# EAGLE board BikeAlarmSystem (EAGLE 8.5.2)
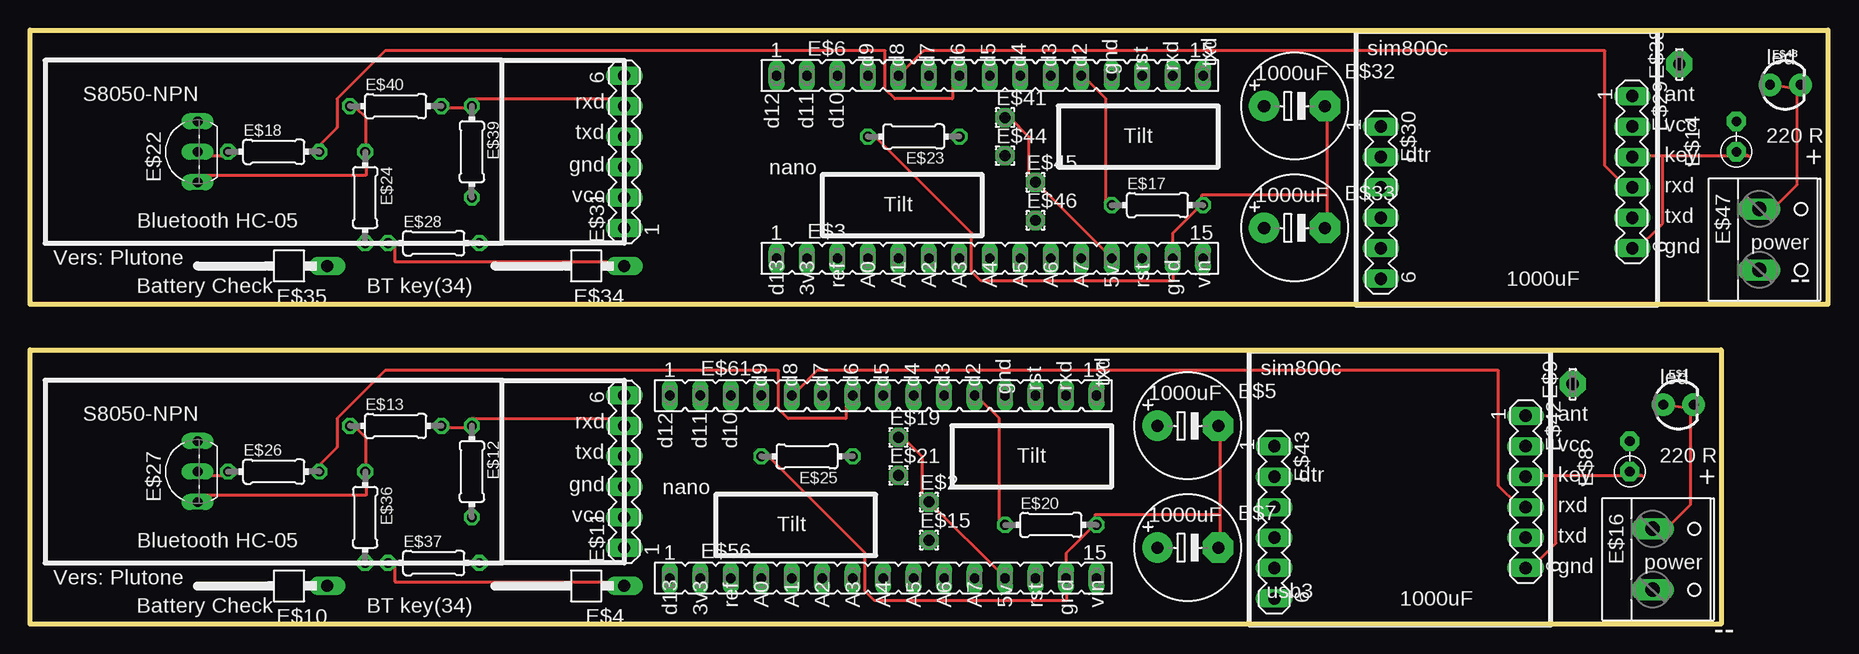
[diagram p0: board, top side]
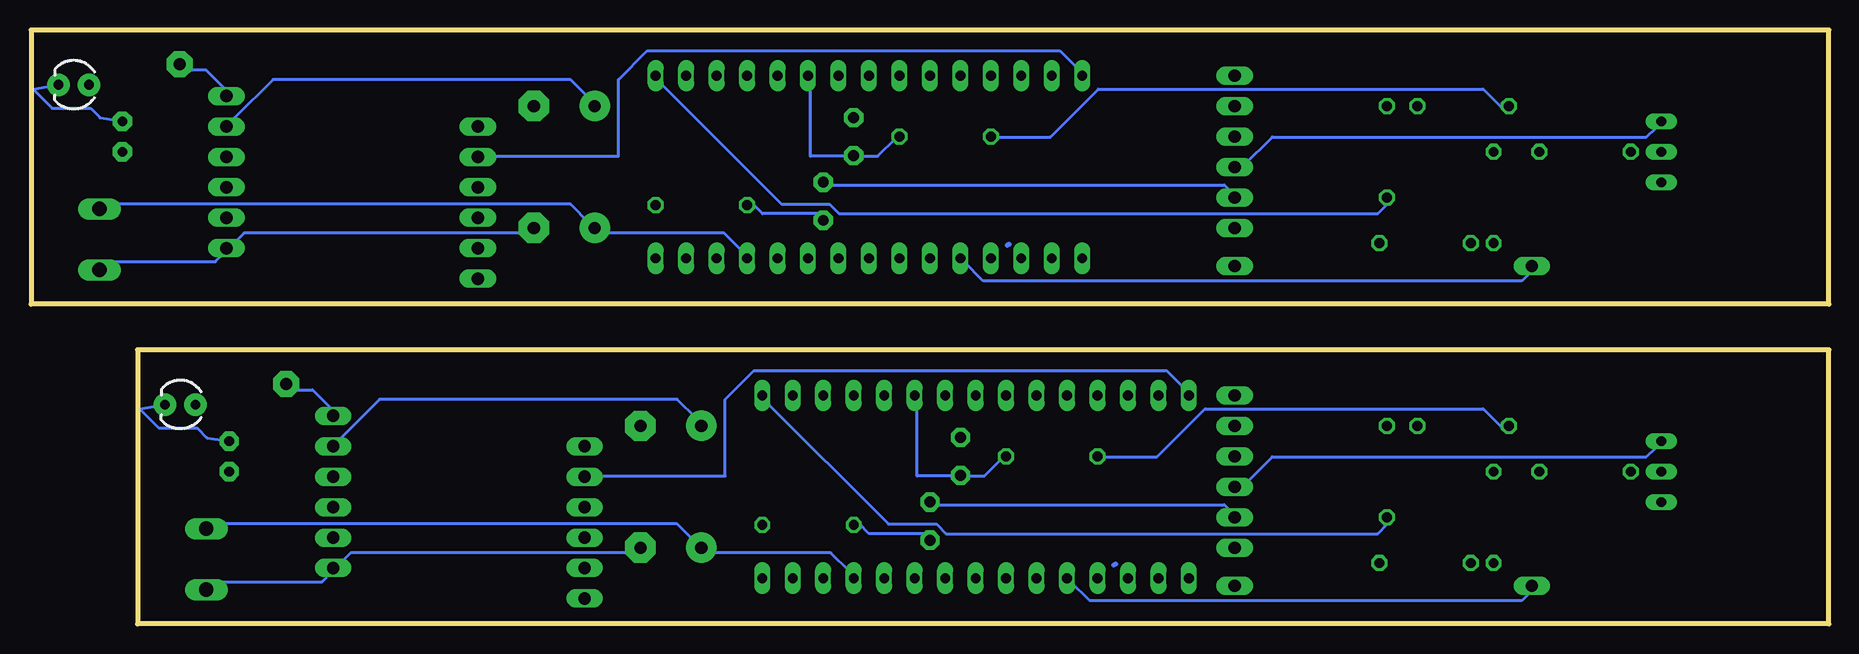
[diagram p1: board, bottom side, seen from below]

Size 149.86 x 49.53 mm. Coordinates in mm from the lower left corner, seen from the top.
Outline: 0,0 0,22.86 140.97,22.86 140.97,0 0,0
Outline: 0,26.67 0,49.53 149.86,49.53 149.86,26.67 0,26.67
Copper layers (1*16): Top 0.035mm / dielectric 1.5mm / Bottom 0.035mm
Design rules "default": minimum track width 10mil, minimum drill 24mil, track to track 8mil, track to pad 8mil, pad to pad 8mil, via to via 8mil, smd to smd 8mil, copper to edge 40mil, drill to drill 8mil, minimum pad ring 10mil, minimum via ring 8mil, stop-mask expansion 4mil, vias tented up to drill 0mil, thermal gap 10mil

## Footprints (pad centres in the part's own frame; a part is rotated, then mirrored left to right if it is on the bottom)
LED_3MM = drill 0.813 pad 1.88: A -1.27,0; K 1.27,0
1,6/0,9 = drill 0.914 pad 1.6 octagon: 1 0,0
FE15 = drill 0.813 long: 1 -17.78,0; 2 -15.24,0; 3 -12.7,0; 4 -10.16,0; 5 -7.62,0; 6 -5.08,0; 7 -2.54,0; 8 0,0; 9 2.54,0; 10 5.08,0; 11 7.62,0; 12 10.16,0; 13 12.7,0; 14 15.24,0; 15 17.78,0
1X01/90 = drill 1.016 long: 1 -1.27,-3.81
E5-8,5 = drill 1.016 pad 2.54: + -2.54,0 | drill 1.016 pad 2.54 octagon: - 2.54,0
RS-2,5 = drill 0.813 pad 1.6 octagon: 1 -1.27,0; 2 1.27,0
LSP10 = drill 1.016 pad 2.159 octagon: MP 0,0
MA06-1 = drill 1.016 long: 1 -6.35,0; 2 -3.81,0; 3 -1.27,0; 4 1.27,0; 5 3.81,0; 6 6.35,0
0204/7 = drill 0.813 octagon: 1 -3.81,0; 2 3.81,0
W237-132 = drill 1.194 long: 1 -2.54,-0.635; 2 2.54,-0.635
TO92- = drill 0.813 long: 1 2.54,0; 2 0,0; 3 -2.54,0

## Placement (x,y rotation side)
E$1  [LED_3MM]  137.41,18.29 0 top
E$2  [1,6/0,9]  74.93,10.16 0 top
E$3  [FE15]  80.01,30.48 0 top
E$4  [1X01/90]  45.72,4.45 90 top
E$5  [E5-8,5]  96.52,16.51 0 top
E$6  [FE15]  80.01,45.72 0 top
E$7  [E5-8,5]  96.52,6.35 0 top
E$8  [RS-2,5]  133.35,13.97 90 top
E$9  [LSP10]  128.59,20 90 top
E$10  [1X01/90]  20.95,4.45 90 top
E$11  [MA06-1]  49.53,12.7 90 top
E$12  10k  [0204/7]  36.83,12.7 270 top
E$13  22k  [0204/7]  30.48,16.51 0 top
E$14  [RS-2,5]  142.24,40.64 90 top
E$15  [1,6/0,9]  74.93,6.99 0 top
E$16  [W237-132]  135.89,5.4 270 top
E$17  10k  [0204/7]  93.98,34.92 0 top
E$18  2.2k  [0204/7]  20.32,39.37 0 top
E$19  [1,6/0,9]  72.39,15.56 0 top
E$20  10k  [0204/7]  85.09,8.26 0 top
E$21  [1,6/0,9]  72.39,12.38 0 top
E$22  [TO92-]  13.97,39.37 90 top
E$23  10k  [0204/7]  73.66,40.64 180 top
E$24  22k  [0204/7]  27.94,35.56 270 top
E$25  10k  [0204/7]  64.77,13.97 180 top
E$26  2.2k  [0204/7]  20.32,12.7 0 top
E$27  [TO92-]  13.97,12.7 90 top
E$28  10k  [0204/7]  33.66,31.75 0 top
E$29  [MA06-1]  133.56,37.68 270 top
E$30  [MA06-1]  112.61,35.14 270 top
E$31  [MA06-1]  49.53,39.37 90 top
E$32  [E5-8,5]  105.41,43.18 0 top
E$33  [E5-8,5]  105.41,33.02 0 top
E$34  [1X01/90]  45.72,31.11 90 top
E$35  [1X01/90]  20.95,31.11 90 top
E$36  22k  [0204/7]  27.94,8.89 270 top
E$37  10k  [0204/7]  33.66,5.08 0 top
E$38  [LSP10]  137.48,46.67 90 top
E$39  10k  [0204/7]  36.83,39.37 270 top
E$40  22k  [0204/7]  30.48,43.18 0 top
E$41  [1,6/0,9]  81.28,42.23 0 top
E$42  [MA06-1]  124.67,11.01 270 top
E$43  [MA06-1]  103.72,8.47 270 top
E$44  [1,6/0,9]  81.28,39.05 0 top
E$45  [1,6/0,9]  83.82,36.83 0 top
E$46  [1,6/0,9]  83.82,33.65 0 top
E$47  [W237-132]  144.78,32.07 270 top
E$48  [LED_3MM]  146.3,44.96 0 top
E$56  [FE15]  71.12,3.81 0 top
E$61  [FE15]  71.12,19.05 0 top

## Library data of the parts
E$1 E$48 = SparkFun-LED
E$2 E$15 E$19 E$21 E$41 E$44-E$46 = wirepad
E$3 E$6 E$56 E$61 = con-lsta
E$4 E$10 E$34 E$35 = pinhead
E$5 E$7 E$32 E$33 = ref-packages-longpad
E$8 E$14 = discrete
E$9 E$38 = solpad
E$11 E$29-E$31 E$42 E$43 = con-lstb
E$12 E$13 E$17 E$18 E$20 E$23-E$26 E$28 E$36 E$37 E$39 E$40 = eagle-ltspice
E$16 E$47 = con-wago-508
E$22 E$27 = transistor-fet

## Nets
S$2: E$11.3 E$27.1
S$3: E$61.14
S$4: E$14.2 E$48.K
S$5: E$61.3
S$7: E$1.K E$8.2
S$8: E$6.11 E$17.1 E$46.1
S$9: E$9.MP E$42.1
S$10: E$26.1 E$27.2
S$11: E$12.2 E$61.15
S$12: E$61.6
S$13: E$42.4 E$61.5
S$14: E$5.+ E$42.2
S$15: E$43.2 E$61.1
S$16: E$61.2
S$17: E$61.8
S$18: E$61.9
S$19: E$61.12
S$20: E$26.2 E$61.7
S$21: E$61.13
S$22: E$56.1
S$23: E$56.2
S$24: E$56.3
S$25: E$56.4
S$26: E$1.A E$2.1 E$7.+ E$11.2 E$16.1 E$19.1 E$56.12
S$27: E$10.1 E$56.5
S$28: E$56.6
S$29: E$56.7
S$30: E$56.8
S$31: E$4.1 E$36.2 E$37.1
S$32: E$56.9
S$33: E$56.10
S$34: E$11.5 E$12.1 E$13.2
S$35: E$15.1 E$20.1 E$61.11
S$36: E$56.11
S$37: E$56.13
S$38: E$56.15
S$39: E$21.1 E$25.1 E$61.10
S$40: E$18.1 E$22.2
S$42: E$5.- E$7.- E$8.1 E$13.1 E$16.2 E$20.2 E$25.2 E$27.3 E$36.1 E$42.3 E$42.6 E$56.14
S$43: E$6.7 E$18.2
S$44: E$24.2 E$28.1 E$34.1
S$45: E$11.4
S$46: E$6.15 E$39.2
S$47: E$31.4
S$48: E$37.2
S$49: E$6.14
S$50: E$42.5
S$51: E$29.5
S$52: E$6.6
S$53: E$6.5 E$29.4
S$54: E$28.2
S$55: E$6.3
S$56: E$6.1 E$30.2
S$57: E$6.2
S$58: E$6.8
S$59: E$6.9
S$60: E$6.12
S$61: E$6.13
S$62: E$3.1
S$63: E$3.2
S$64: E$3.3
S$65: E$3.4
S$66: E$3.5 E$35.1
S$67: E$3.6
S$68: E$3.7
S$69: E$3.8
S$70: E$3.9
S$71: E$3.10
S$72: E$3.11
S$73: E$3.13
S$74: E$3.15
S$75: E$3.14 E$14.1 E$17.2 E$22.3 E$23.2 E$24.1 E$29.3 E$29.6 E$32.- E$33.- E$40.1 E$47.2
S$77: E$29.2 E$32.+
S$78: E$29.1 E$38.MP
S$79: E$31.5 E$39.1 E$40.2
S$80: E$3.12 E$31.2 E$33.+ E$41.1 E$45.1 E$47.1 E$48.A
S$81: E$6.10 E$23.1 E$44.1
S$82: E$22.1 E$31.3

## Tracks (layer width: path | path; a pad name or v marks a point on that pad's centre or on a via)
S$2
  Bottom 0.254: E$27.1 14.4,14.73 15.2,13.93 46.4,13.93 48.8,11.53 E$11.3
S$4
  Bottom 0.254: E$14.2 144.09,42.2 144.89,43 148.09,43 149.69,44.6 E$48.K
S$7
  Bottom 0.254: E$8.2 135.2,15.53 136,16.33 139.2,16.33 140.8,17.93 E$1.K
S$8
  Top 0.254: E$6.11 88.09,45.4 89.69,43.8 89.69,35 E$17.1
  Bottom 0.254: E$17.1 89.69,35 88.89,34.2 84.09,34.2 E$46.1
S$9
  Bottom 0.254: E$42.1 124.8,17.93 126.4,19.53 128,19.53 E$9.MP
S$10
  Top 0.254: E$27.2 14.4,12.33 16,12.33 E$26.1
S$11
  Bottom 0.254: E$12.2 36.8,8.33 37.6,7.53 73.6,7.53 74.4,8.33 78.4,8.33 88.8,18.73 E$61.15
S$13
  Top 0.254: E$61.5 64,19.53 65.6,21.13 122.4,21.13 122.4,11.53 124,9.93 E$42.4
S$14
  Bottom 0.254: E$42.2 124,15.53 120.8,18.73 96,18.73 94.4,17.13 E$5.+
S$15
  Bottom 0.254: E$61.1 53.6,19.53 55.2,21.13 89.6,21.13 92,18.73 92,12.33 103.2,12.33 E$43.2
S$20
  Top 0.254: E$26.2 24,13.13 25.6,14.73 25.6,17.13 29.6,21.13 62.4,21.13 62.4,17.93 63.2,17.13 68,17.13 68,18.73 E$61.7
S$26
  Top 0.254: E$16.1 136.8,8.33 138.4,9.93 138.4,17.93 E$1.A | E$56.12 80.8,4.33 75.2,9.93 E$2.1 74.4,10.73 74.4,13.93 72.8,15.53 E$19.1
  Bottom 0.254: E$11.2 49.6,9.13 50.4,9.93 74.4,9.93 E$2.1 | E$56.12 81.6,4.33 83.2,5.93 93.6,5.93 E$7.+ 94.4,6.73 96,8.33 136,8.33 E$16.1
S$27
  Bottom 0.254: E$56.5 63.2,3.53 61.6,1.93 25.6,1.93 24.8,2.73 E$10.1
S$31
  Top 0.254: E$36.2 28,5.13 29.6,5.13 E$37.1 30.4,5.13 30.4,3.53 48.8,3.53 E$4.1
S$34
  Top 0.254: E$13.2 34.4,16.33 36.8,16.33 E$12.1 36.8,17.13 48.8,17.13 E$11.5
S$35
  Top 0.254: E$61.11 79.2,18.73 80.8,17.13 80.8,8.33 E$20.1
  Bottom 0.254: E$20.1 80.8,8.33 80,7.53 75.2,7.53 E$15.1
S$39
  Bottom 0.254: E$25.1 68.8,13.93 70.4,12.33 72,12.33 E$21.1 72.8,12.33 76,12.33 76,18.73 E$61.10
S$40
  Top 0.254: E$22.2 14.4,39 16,39 E$18.1
S$41
  Bottom 0.406: 59.44,4.99 59.6,4.91
S$42
  Top 0.254: 127.2,12.33 134.4,12.33 E$8.1 | 127.2,12.33 124.8,12.33 E$42.3 | 127.2,12.33 127.2,6.73 124.8,4.33 E$42.6 | E$27.3 14.4,10.73 28,10.73 28,12.33 E$36.1 28,13.13 28,15.53 27.2,16.33 E$13.1 | 99.2,9.13 99.2,16.33 E$5.- | 99.2,9.13 99.2,6.73 E$7.- | E$25.2 61.6,13.93 69.6,5.93 69.6,2.73 70.4,1.93 86.4,1.93 86.4,3.53 E$56.14 86.4,4.33 86.4,5.93 88.8,8.33 | 99.2,9.13 88.8,9.13 88.8,8.33 | 88.8,8.33 E$20.2
  Bottom 0.254: E$16.2 136,3.53 125.6,3.53 124.8,4.33 E$42.6 124,5.13 123.2,5.93 99.2,5.93 E$7.- | E$13.1 27.2,16.33 28.8,17.93 52,17.93 56,13.93 60.8,13.93 E$25.2
S$43
  Top 0.254: E$18.2 24,39.8 25.6,41.4 25.6,43.8 29.6,47.8 71.29,47.8 71.29,44.6 72.09,43.8 76.89,43.8 76.89,45.4 E$6.7
S$44
  Top 0.254: E$24.2 28,31.8 29.6,31.8 E$28.1 30.4,31.8 30.4,30.2 48.8,30.2 E$34.1
S$46
  Bottom 0.254: E$39.2 36.8,35 37.6,34.2 82.49,34.2 83.29,35 87.29,35 97.69,45.4 E$6.15
S$53
  Top 0.254: E$6.5 72.89,46.2 74.49,47.8 131.29,47.8 131.29,38.2 132.89,36.6 E$29.4
S$56
  Bottom 0.254: E$6.1 62.49,46.2 64.09,47.8 98.49,47.8 100.89,45.4 100.89,39 112.09,39 E$30.2
S$66
  Bottom 0.254: E$3.5 72.09,30.2 70.49,28.6 25.6,28.6 24.8,29.4 E$35.1
S$75
  Top 0.254: 136.09,39 143.29,39 E$14.1 | 136.09,39 133.69,39 E$29.3 | 136.09,39 136.09,33.4 133.69,31 E$29.6 | E$22.3 14.4,37.4 28,37.4 28,39 E$24.1 28,39.8 28,42.2 27.2,43 E$40.1 | 108.09,35.8 108.09,43 E$32.- | 108.09,35.8 108.09,33.4 E$33.- | E$23.2 70.49,40.6 78.49,32.6 78.49,29.4 79.29,28.6 95.29,28.6 95.29,30.2 E$3.14 95.29,31 95.29,32.6 97.69,35 | 108.09,35.8 97.69,35.8 97.69,35 | 97.69,35 E$17.2
  Bottom 0.254: E$47.2 144.89,30.2 134.49,30.2 133.69,31 E$29.6 132.89,31.8 132.09,32.6 108.09,32.6 E$33.- | E$40.1 27.2,43 28.8,44.6 60.89,44.6 64.89,40.6 69.69,40.6 E$23.2
S$76
  Bottom 0.406: 68.33,31.66 68.49,31.58
S$77
  Bottom 0.254: E$29.2 132.89,42.2 129.69,45.4 104.89,45.4 103.29,43.8 E$32.+
S$78
  Bottom 0.254: E$29.1 133.69,44.6 135.29,46.2 136.89,46.2 E$38.MP
S$79
  Top 0.254: E$40.2 34.4,43 36.8,43 E$39.1 36.8,43.8 48.8,43.8 E$31.5
S$80
  Top 0.254: E$47.1 145.69,35 147.29,36.6 147.29,44.6 E$48.A | E$3.12 89.69,31 84.09,36.6 E$45.1 83.29,37.4 83.29,40.6 81.69,42.2 E$41.1
  Bottom 0.254: E$31.2 49.6,35.8 50.4,36.6 83.29,36.6 E$45.1 | E$3.12 90.49,31 92.09,32.6 102.49,32.6 E$33.+ 103.29,33.4 104.89,35 144.89,35 E$47.1
S$81
  Bottom 0.254: E$23.1 77.69,40.6 79.29,39 80.89,39 E$44.1 81.69,39 84.89,39 84.89,45.4 E$6.10
S$82
  Bottom 0.254: E$22.1 14.4,41.4 15.2,40.6 46.4,40.6 48.8,38.2 E$31.3

## Text on the board
tPlace: sim800c | d9 | d8 | d7 | d6 | d5 | d4 | d3 | d2 | txd | 1000uF | led | gnd | rst | rxd | S8050-NPN | ant | rxd | d12 | d11 | d10 | 220 R | txd | vcc | Tilt | gnd | dtr | key | nano | + | vcc | 1000uF | rxd | Tilt | txd | Bluetooth HC-05 | power | gnd | Vers: Plutone | 1000uF | Battery Check | BT key(34) | d13 | 3v3 | ref | A0 | A1 | A2 | A3 | A4 | A5 | A6 | A7 | 5v | rst | gnd | vin | -- | sim800c | d9 | d8 | d7 | d6 | d5 | d4 | d3 | d2 | rst | rxd | txd | 1000uF | led | gnd | S8050-NPN | rxd | ant | d12 | d11 | d10 | vcc | 220 R | txd | Tilt | gnd | dtr | key | + | nano | vcc | 1000uF | rxd | Tilt | Bluetooth HC-05 | txd | power | Vers: Plutone | usb3 | gnd | 1000uF | ref | A0 | A1 | A2 | A3 | A4 | A5 | A6 | A7 | 5v | rst | vin | Battery Check | BT key(34) | d13 | 3v3 | gnd | --